# Altium PCB REV_A_PCB.PcbDoc
Units mm, origin at the board's own origin, x right, y up, seen from the top; angles counter-clockwise.
Board outline 99 x 68.12 mm, 4 copper layers (Top Layer, GND, PWR, Bottom Layer), stack 1.564 mm thick; 78 components, 63 nets, 257 pads, 153 vias.
Unrouted connection lines stored in the file: 4.
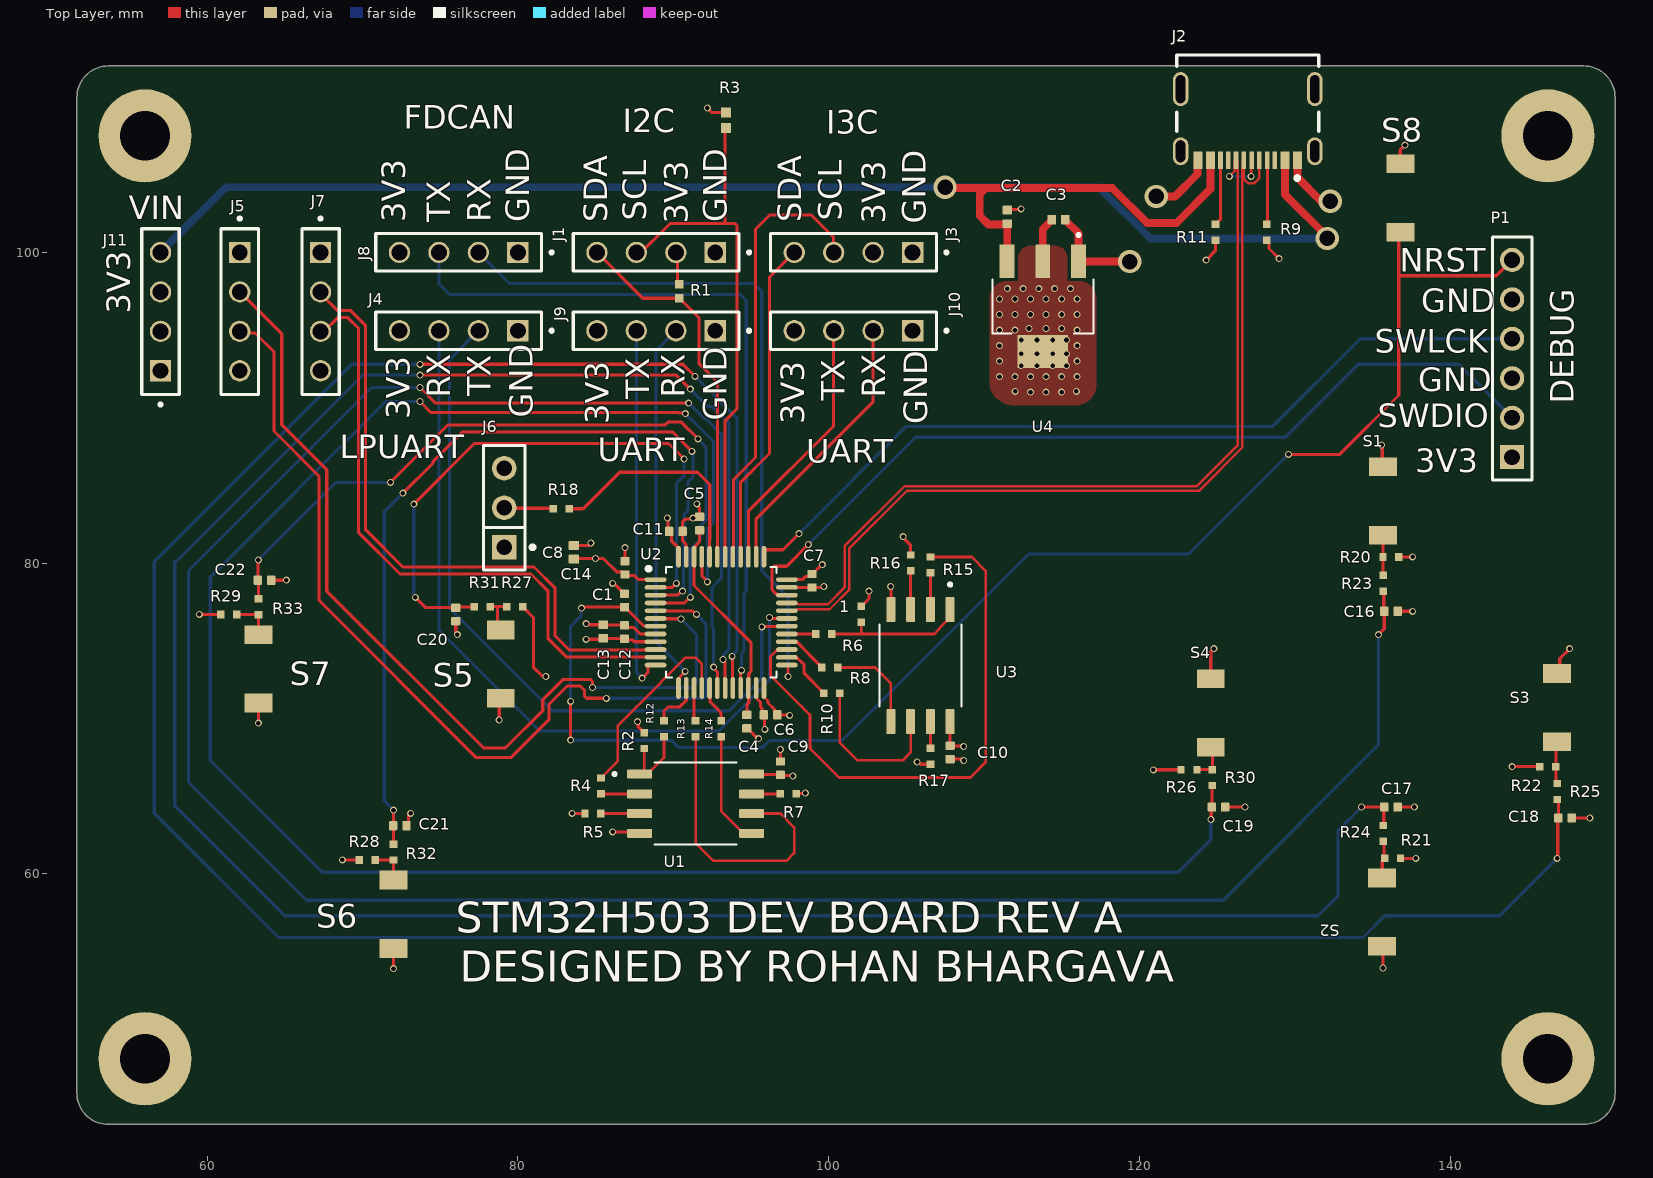
[diagram p0: Top Layer view]
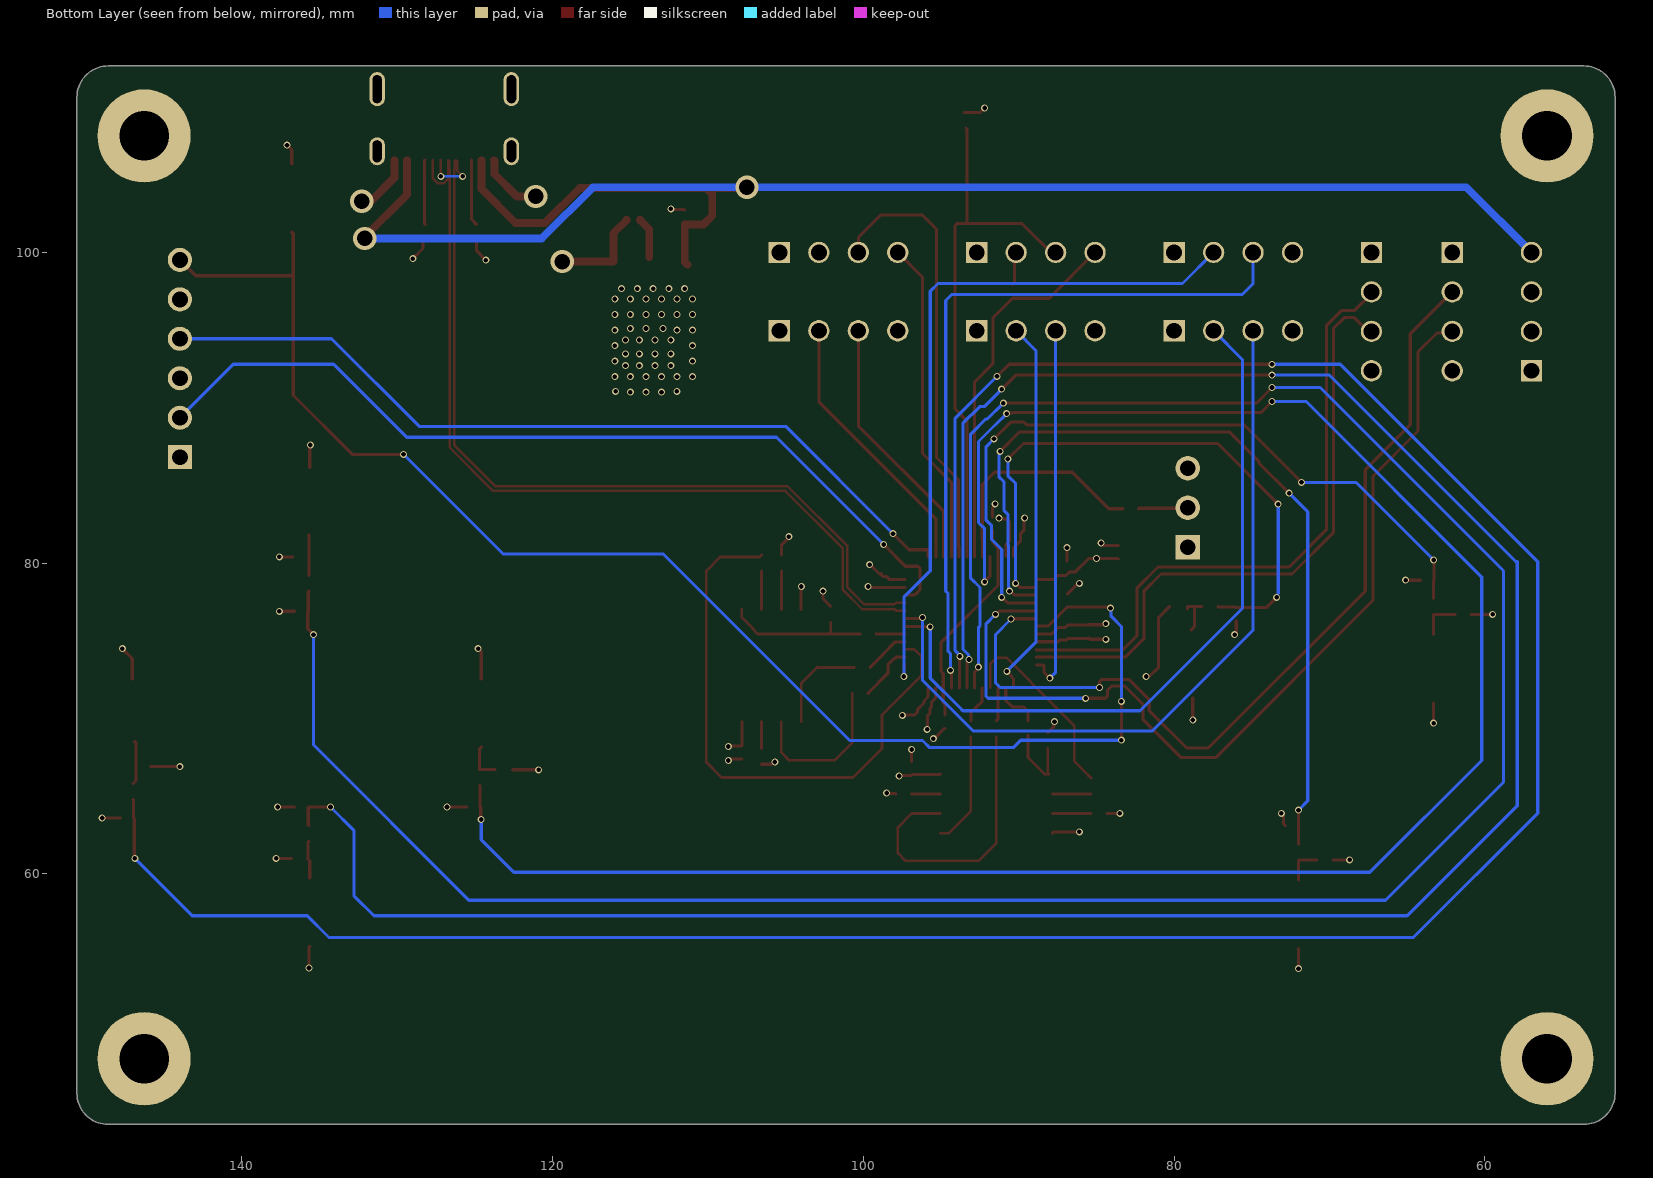
[diagram p1: Bottom Layer view, seen from below]
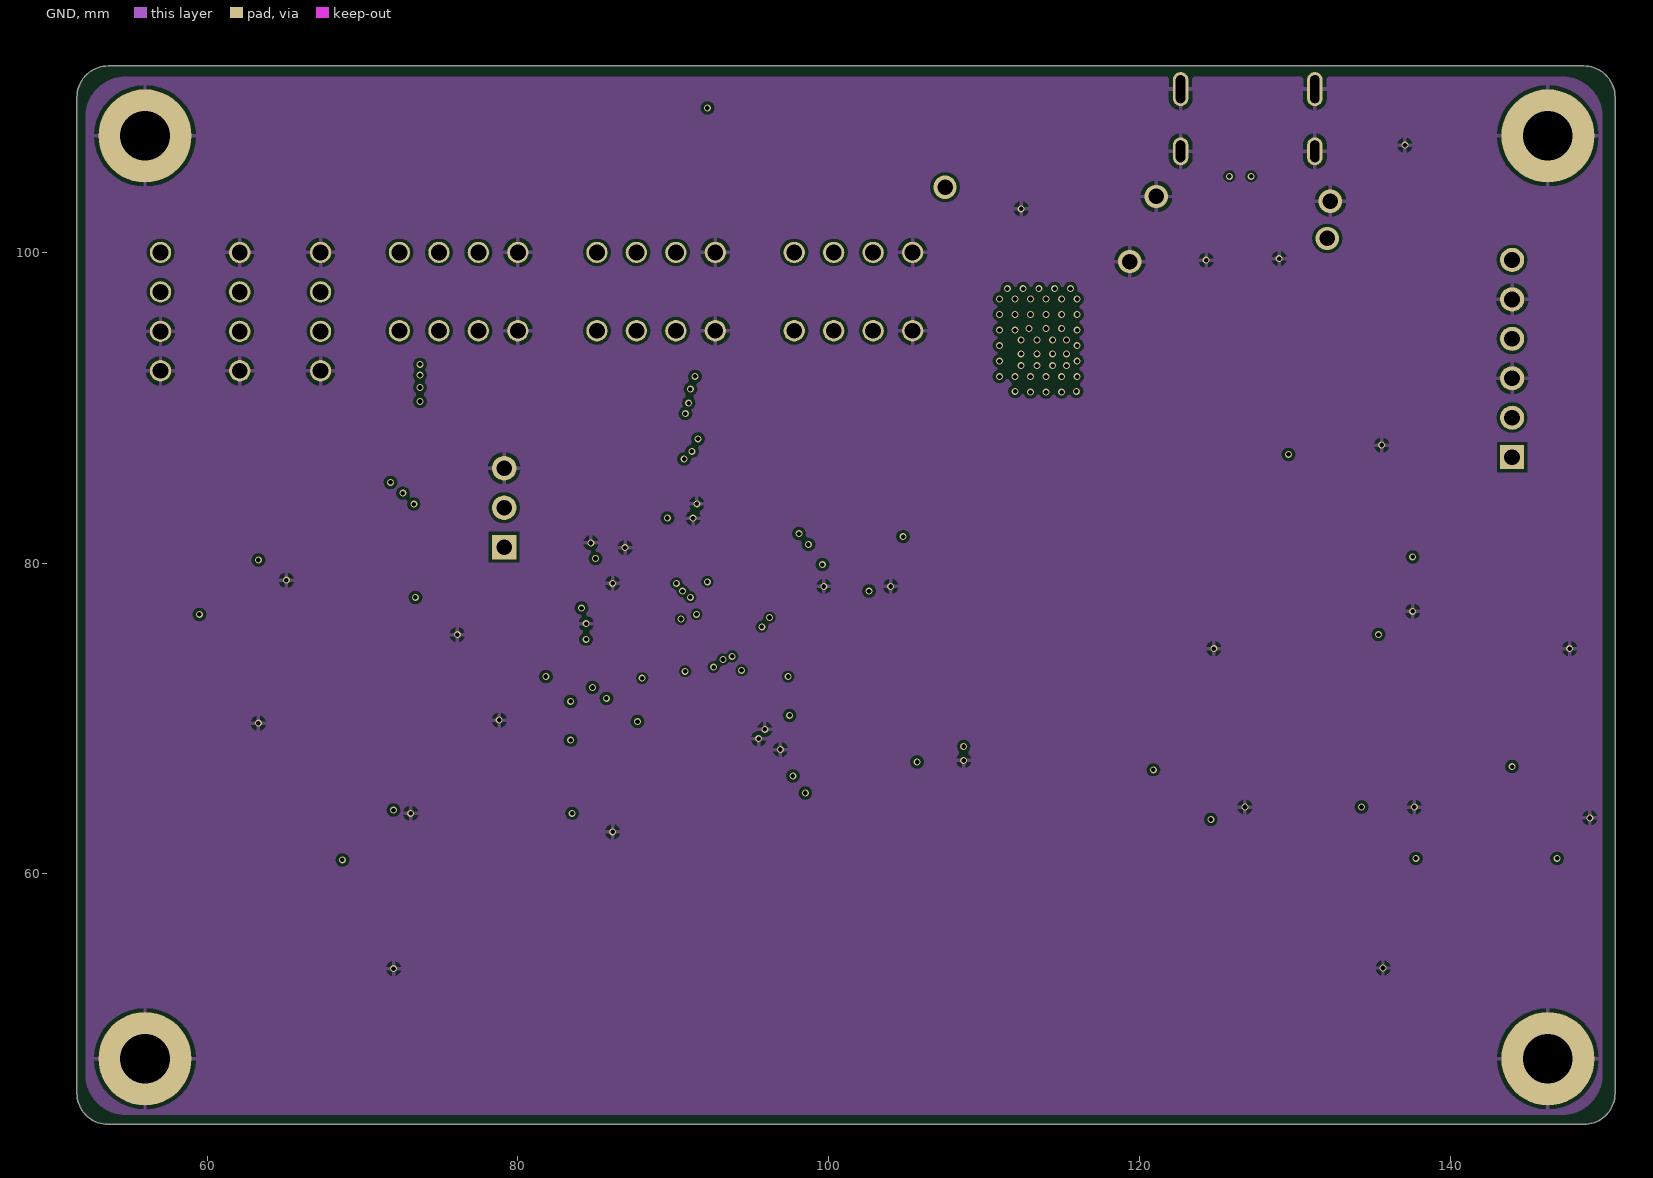
[diagram p2: GND]
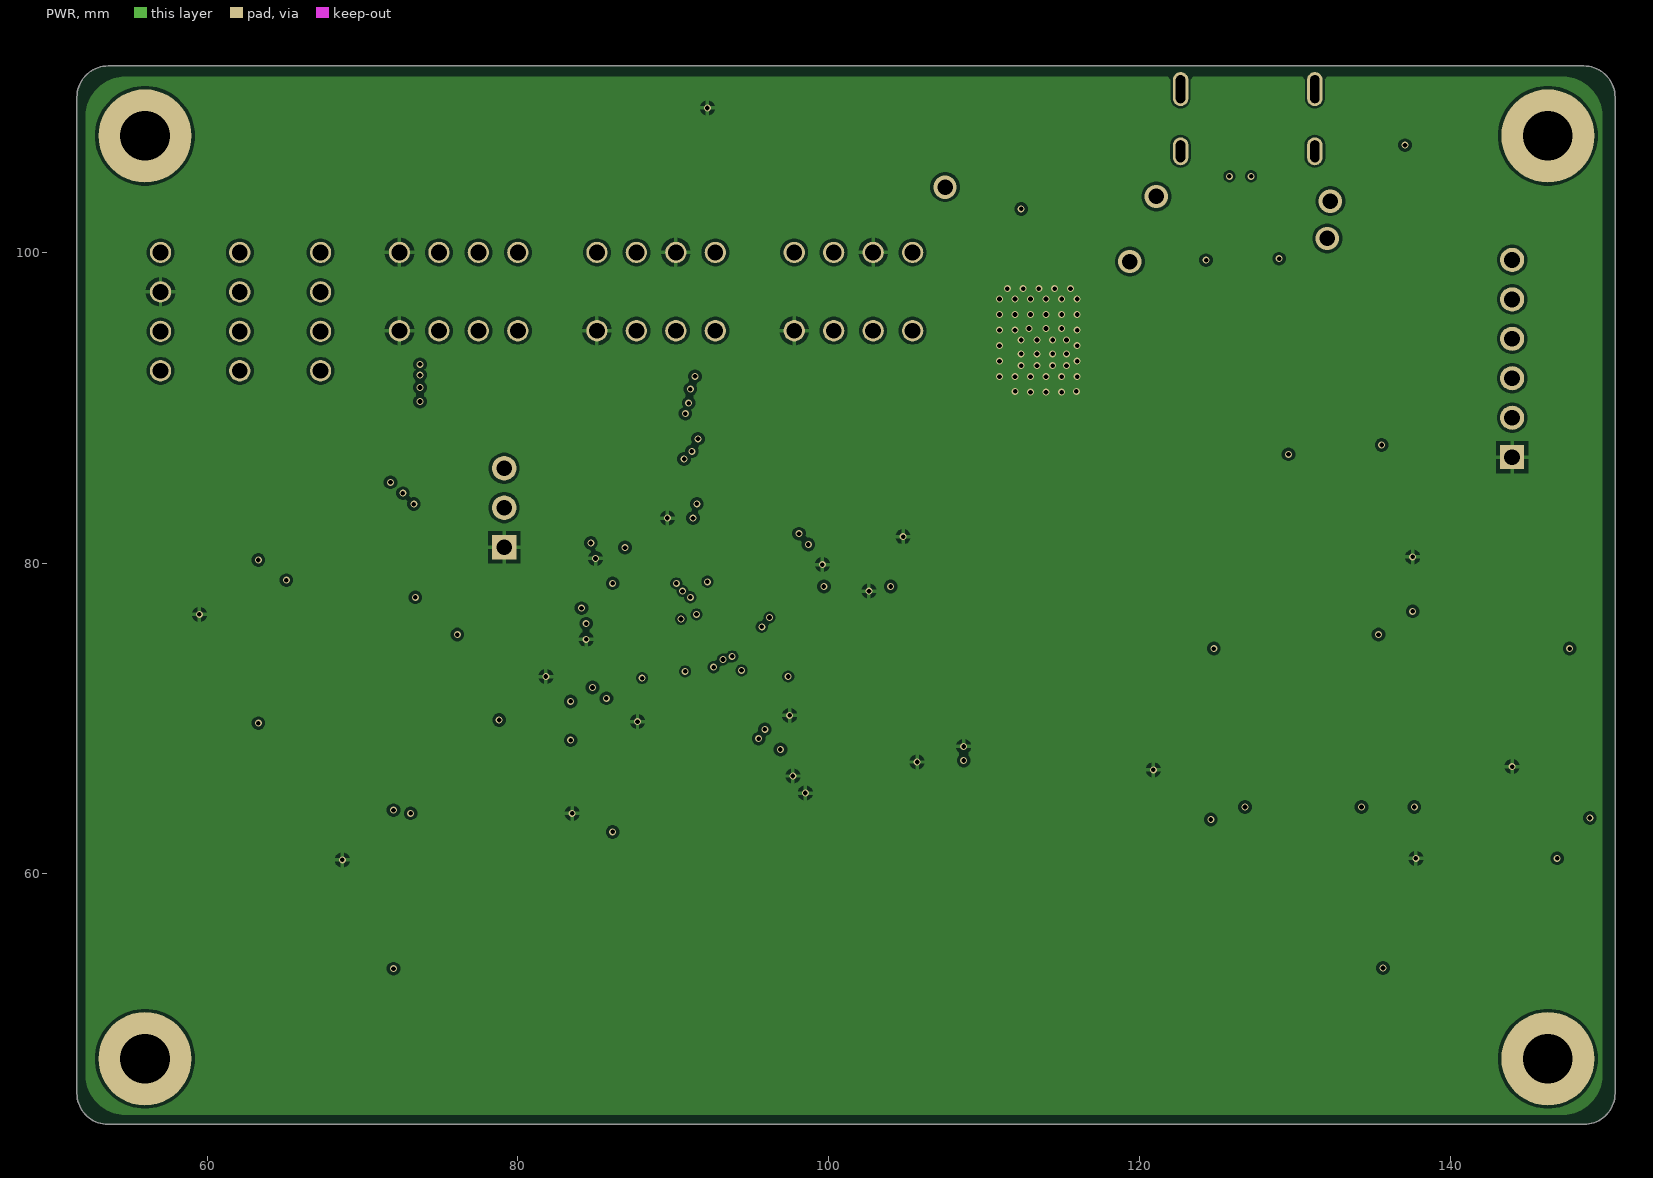
[diagram p3: PWR]
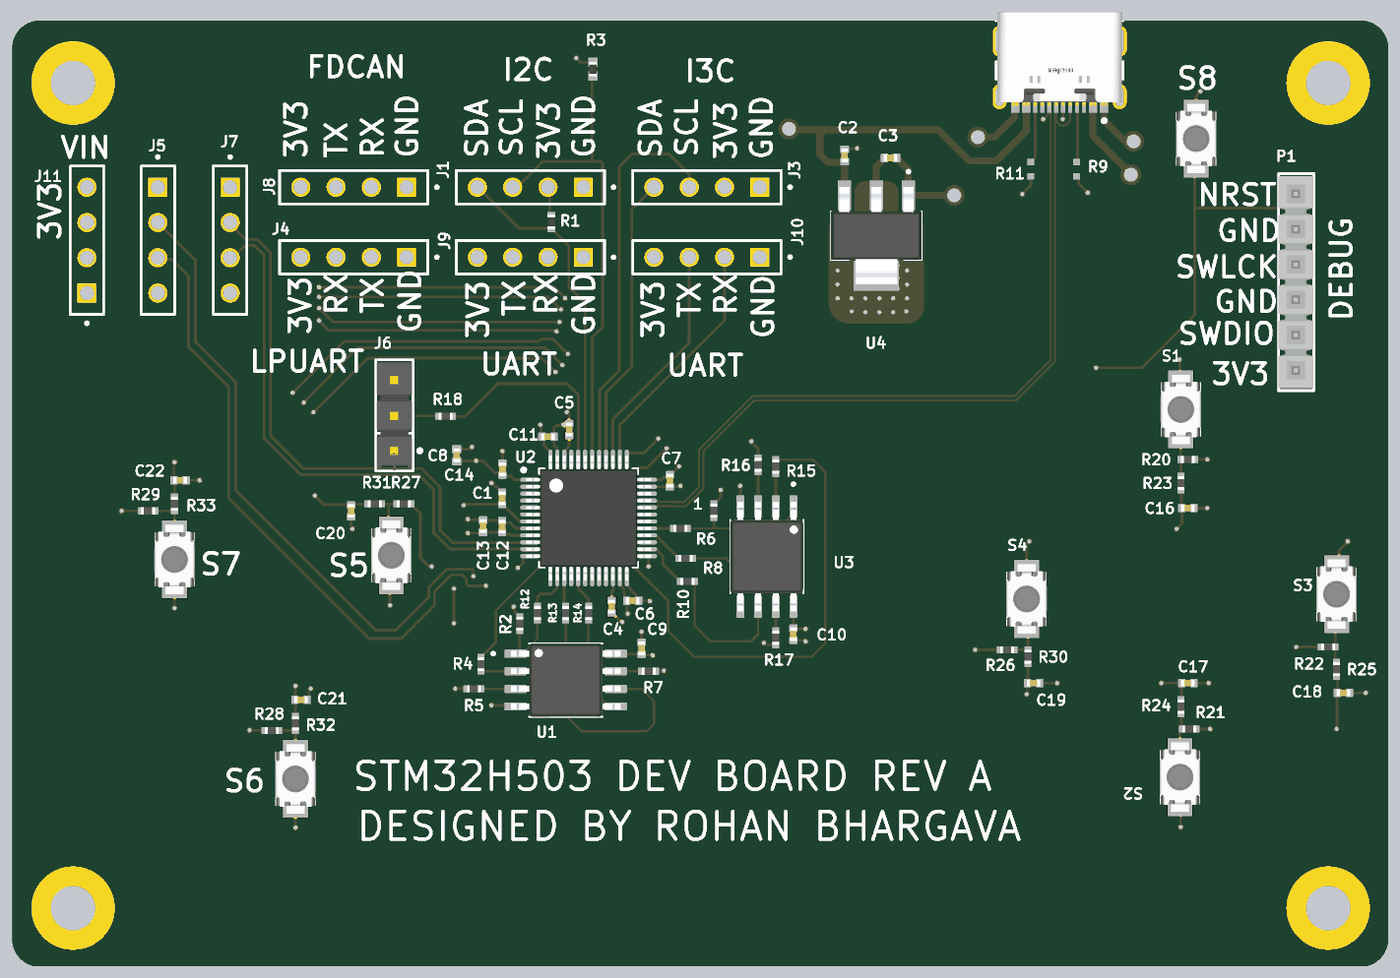
[diagram p4: 3D render of the assembled board from above, using the file's embedded part models]

## Layer stack, top to bottom
Top Solder: solder mask 0.0102, Solder Resist, Dk 3.5
Top Layer: signal copper 0.035
Dielectric 2: prepreg 0.0994, PP-006, Dk 4.1
GND: signal copper 0.0152
Dielectric 1: dielectric 1.265, FR-4, Dk 4.6
PWR: signal copper 0.0152
Dielectric 3: prepreg 0.0994, PP-006, Dk 4.1
Bottom Layer: signal copper 0.035
Bottom Solder: solder mask 0.0102, Solder Resist, Dk 3.5

## Board outline
51.622,45.875 51.622,110 cw(c53.622,110) 53.622,112 148.622,112 cw(c148.622,110) 150.622,110 150.622,45.875 cw(c148.622,45.875) 148.622,43.875 53.622,43.875 cw(c53.622,45.875)

## Design rules (kind name [scope] priority, off if disabled: settings)
Clearance ADC_PAIR_CLEARANCE [InNet('ADC1_IN1_N') vs InNet('ADC1_IN1_P')] p1: gap=0.1 ignorepadtopadclearanceinfootprint=FALSE
Clearance USB_DIFF_PAIR_CLEARANCE [InNetClass('USB_FS') vs InNetClass('USB_FS')] p2: gap=0.15 ignorepadtopadclearanceinfootprint=FALSE
Clearance USB_PORT [WithinRoom('USB')] p3: gap=0.15 ignorepadtopadclearanceinfootprint=FALSE
Clearance MCU_BREAKOUT [WithinRoom('MCU')] p4: gap=0.15 ignorepadtopadclearanceinfootprint=FALSE
Clearance [All] p5: gap=0.2 ignorepadtopadclearanceinfootprint=FALSE
DiffPairsRouting ADC_Diff_Pair [InDifferentialPair('ADC1_IN1')] p1: maxlimit=0.25 minlimit=0.25 mostfreqgap=0.25 toplayer_minwidth=0.2 toplayer_maxwidth=0.2 toplayer_prefwidth=0.2 midlayer1_minwidth=0.2 midlayer1_maxwidth=0.2 midlayer1_prefwidth=0.2 midlayer2_minwidth=0.2 midlayer2_maxwidth=0.2 midlayer2_prefwidth=0.2 bottomlayer_minwidth=0.2 bottomlayer_maxwidth=0.2 bottomlayer_prefwidth=0.2 maxuncoupledlength=12.7
DiffPairsRouting USB_FS [InDifferentialPair('USB_D')] p2: maxlimit=0.15 minlimit=0.15 mostfreqgap=0.15 toplayer_minwidth=0.159 toplayer_maxwidth=0.159 toplayer_prefwidth=0.159 midlayer1_minwidth=0.159 midlayer1_maxwidth=0.159 midlayer1_prefwidth=0.159 midlayer2_minwidth=0.159 midlayer2_maxwidth=0.159 midlayer2_prefwidth=0.159 bottomlayer_minwidth=0.159 bottomlayer_maxwidth=0.159 bottomlayer_prefwidth=0.159 maxuncoupledlength=12.7
DiffPairsRouting [All] p3: maxlimit=0.254 minlimit=0.254 mostfreqgap=0.254 toplayer_minwidth=0.381 toplayer_maxwidth=0.381 toplayer_prefwidth=0.381 midlayer1_minwidth=0.381 midlayer1_maxwidth=0.381 midlayer1_prefwidth=0.381 midlayer2_minwidth=0.381 midlayer2_maxwidth=0.381 midlayer2_prefwidth=0.381 bottomlayer_minwidth=0.381 bottomlayer_maxwidth=0.381 bottomlayer_prefwidth=0.381 maxuncoupledlength=12.7
HoleSize [All] p1: absolutevalues=TRUE maxlimit=5 minlimit=0.025 maxpercent=80.000 minpercent=20.000
MinimumSolderMaskSliver MCU_Solder_Mask [WithinRoom('MCU')] p1: minsoldermaskwidth=0.15
MinimumSolderMaskSliver [All] p2: minsoldermaskwidth=0.1
PlaneConnect LDO_Heatsink_Connection [WithinRoom('LDO_Heatsink')] p1: planeconnectstyle=Direct reliefexpansion=0.508 reliefentries=4 reliefconductorwidth=0.254 reliefairgap=0.254
PlaneConnect [All] p2: planeconnectstyle=Relief reliefexpansion=0.508 reliefentries=4 reliefconductorwidth=0.254 reliefairgap=0.254
PolygonConnect LDO_Heatsink_Poly [WithinRoom('LDO_Heatsink')] p1: connectstyle=Direct reliefconductorwidth=0.254 reliefentries=4 polygonreliefangle="90 Angle" airgapwidth=0.254
PolygonConnect [All] p2: connectstyle=Relief reliefconductorwidth=0.254 reliefentries=4 polygonreliefangle="90 Angle" airgapwidth=0.254
RoomDefinition LDO_Heatsink [False vs False] p1: confinementstyle=ConfineIn formatcopy=TRUE lockcomponents=FALSE outline 110.236,100.965 117.348,100.965 117.348,90.17 110.236,90.17
RoomDefinition USB [InComponentClass('Room Definition2') vs False] p2: confinementstyle=ConfineIn formatcopy=TRUE lockcomponents=FALSE outline 121.597,104.28 121.597,113.163 132.361,113.163 132.361,104.28
RoomDefinition MCU [InComponentClass('Room Definition1') vs False] p3: confinementstyle=ConfineIn formatcopy=TRUE lockcomponents=FALSE outline 87.637,70.746 87.637,81.654 98.545,81.654 98.545,70.746
RoutingVias [All] p1: holewidth=0.3 width=0.45 viastyle="Through Hole" minholewidth=0.3 minwidth=0.45 maxholewidth=5 maxwidth=10
SilkToSilkClearance [All] p1: silktosilkclearance=0.15
SilkToSolderMaskClearance [IsPad] p1: minsilkscreentomaskgap=0.15 clearancetoexposedcopper=TRUE
SolderMaskExpansion [All] p1: expansion=0 istentingtop=FALSE
SupplyNets "Schematic Supply Nets_3" [InNet('3V3')] p1: voltage=0.000
SupplyNets "Schematic Supply Nets_2" [InNet('GND')] p2: voltage=0.000
SupplyNets "Schematic Supply Nets_1" [InNet('VIN')] p3: voltage=0.000
SupplyNets "Schematic Supply Nets" [InNet('VCAP')] p4: voltage=0.000
Width USB_FS_WIDTH [InNetClass('USB_FS')] p1: maxlimit=0.159 minlimit=0.159 preferedwidth=0.159
Width SPI [InNetClass('SPI')] p2: maxlimit=0.171 minlimit=0.171 preferedwidth=0.171
Width [All] p3: maxlimit=1 minlimit=0.18 preferedwidth=0.2
24 further rules are at their usual default settings.

## Classes and differential pairs
component class "Room Definition2": J2
net class USB_FS: USB_D_N USB_D_P
net class SPI: SPI1_MISO SPI1_MOSI SPI1_NCS SPI1_SCK SPI2_CLK SPI2_MISO SPI2_MOSI SPI2_NCS
component class "Room Definition1": U2
component class Sheet2: C2 C3 C4 C5 C6 C7 C8 C9 C10 C11 C12 C13 C14 J11 U4
component class Sheet1: 1 C1 C16 C17 C18 C19 C20 C21 C22 J1 J2 J3 J4 J5 J6 J7 J8 J9 J10 P1 R1 R2 R3 R4 R5 R6 R7 R8 R9 R10 R11 R12 R13 R14 R15 R16 R17 R18 R20 R21 R22 R23 R24 R25 R26 R27 R28 R29 R30 R31 R32 R33 S1 S2 S3 S4 S5 S6 S7 S8 U1 U2 U3
differential pair USB_D: +USB_D_P -USB_D_N
differential pair ADC1_IN1: +ADC1_IN1_P -ADC1_IN1_N

## Components (designator, comment, footprint, x,y, rotation, side; value= is the part's Value field where it differs from the comment)
1 "ERJ2RKF1002X" RES_ERJ2RKF1002X 102.108,76.708 r90 top
C1 "CL05B104KO5NNNC" CAPC1005X55N 86.868,77.597 r90 top
C2 "CL05A105KA5NQNC" CAPC1005X60N 111.506,102.289 r270 top
C3 "CL05A105KA5NQNC" CAPC1005X60N 114.808,102.108 r180 top
C4 "CL05A225MQ5NSNC" CAPC1005X57N 94.742,69.798 r90 top
C5 "CL05A225MQ5NSNC" CAPC1005X57N 91.694,82.55 r270 top
C6 "CL05B104KO5NNNC" CAPC1005X55N 96.266,70.231 r0 top
C7 "CL05B104KO5NNNC" CAPC1005X55N 98.933,78.867 r90 top
C8 "CL05A475MP5NRNC" CAPC1005X65N 83.6,80.7 r270 top
C9 "CL05B104KO5NNNC" CAPC1005X55N 96.901,66.802 r270 top
C10 "CL05B104KO5NNNC" CAPC1005X55N 107.823,67.818 r90 top
C11 "CL05B104KO5NNNC" CAPC1005X55N 90.17,82.042 r180 top
C12 "CL05B104KO5NNNC" CAPC1005X55N 86.868,75.565 r270 top
C13 "CL05A105KA5NQNC" CAPC1005X60N 85.5,75.6 r270 top
C14 "CL05B104KO5NNNC" CAPC1005X55N 86.9,79.7 r270 top
C16 "CL05B104KO5NNNC" CAPC1005X55N 136.2,76.9 r180 top
C17 "CL05B104KO5NNNC" CAPC1005X55N 136.2,64.3 r180 top
C18 "CL05B104KO5NNNC" CAPC1005X55N 147.4,63.6 r180 top
C19 "CL05B104KO5NNNC" CAPC1005X55N 125.1,64.3 r180 top
C20 "CL05B104KO5NNNC" CAPC1005X55N 76,76.7 r90 top
C21 "CL05B104KO5NNNC" CAPC1005X55N 72.4,63.1 r180 top
C22 "CL05B104KO5NNNC" CAPC1005X55N 63.7,78.9 r180 top
J1 "SSQ-104-01-T-S" SAMTEC_SSQ-104-01-T-S 88.9,100 r180 top
J2 "217179-0001" FP-2171790001-MFG 126.979,109.359 r180 top
J3 "SSQ-104-01-T-S" SAMTEC_SSQ-104-01-T-S 101.6,100 r180 top
J4 "SSQ-104-01-T-S" SAMTEC_SSQ-104-01-T-S 76.19,94.96 r180 top
J5 "SSQ-104-01-T-S" SAMTEC_SSQ-104-01-T-S 62.1,96.19 r270 top
J6 "TSW-103-14-G-S" FP-TSW-103-14-G-S-MFG 79.121,83.566 r90 top
J7 "SSQ-104-01-T-S" SAMTEC_SSQ-104-01-T-S 67.3,96.19 r270 top
J8 "SSQ-104-01-T-S" SAMTEC_SSQ-104-01-T-S 76.19,100 r180 top
J9 "SSQ-104-01-T-S" SAMTEC_SSQ-104-01-T-S 88.9,94.96 r180 top
J10 "SSQ-104-01-T-S" SAMTEC_SSQ-104-01-T-S 101.6,94.96 r180 top
J11 "SSQ-104-01-T-S" SAMTEC_SSQ-104-01-T-S 57,96.19 r90 top
P1 "TSW-106-07-G-S" SMTC-TSW-106-07-X-S 144,86.82 r90 top
R1 "ERJ-2RKF2201X" RESC1005X40X25NL05T05 90.4,97.5 r90 top
R2 "ERJ2RKF1002X" RES_ERJ2RKF1002X 88.138,68.58 r270 top
R3 "ERJ-2RKF2201X" RESC1005X40X25ML05T05 93.4,108.5 r90 top
R4 "ERJ2RKF33R0X" RES_ERJ2RKF33R0X 85.344,65.659 r90 top
R5 "ERJ2RKF1002X" RES_ERJ2RKF1002X 84.836,63.881 r180 top
R6 "ERJ2RKF33R0X" RES_ERJ2RKF33R0X 99.695,75.438 r180 top
R7 "ERJ2RKF1002X" RES_ERJ2RKF1002X 97.409,65.151 r0 top
R8 "ERJ2RKF33R0X" RES_ERJ2RKF33R0X 100.076,73.279 r180 top
R9 "ERJ2RKF5101X" RES_ERJ2RKF5101X 128.2,101.3 r270 top
R10 "ERJ2RKF33R0X" RES_ERJ2RKF33R0X 100.203,71.628 r180 top
R11 "ERJ2RKF5101X" RES_ERJ2RKF5101X 124.9,101.3 r270 top
R12 "ERJ2RKF33R0X" RES_ERJ2RKF33R0X 89.408,69.342 r90 top
R13 "ERJ2RKF33R0X" RES_ERJ2RKF33R0X 91.44,69.342 r90 top
R14 "ERJ2RKF33R0X" RES_ERJ2RKF33R0X 93.091,69.342 r90 top
R15 "ERJ2RKF33R0X" RES_ERJ2RKF33R0X 106.553,79.883 r90 top
R16 "ERJ2RKF1002X" RES_ERJ2RKF1002X 105.283,80.01 r90 top
R17 "ERJ2RKF1002X" RES_ERJ2RKF1002X 106.553,67.564 r270 top
R18 "ERJ2RKF1002X" RES_ERJ2RKF1002X 82.8,83.5 r0 top
R20 "ERJ2RKF1002X" RES_ERJ2RKF1002X 136.2,80.4 r180 top
R21 "ERJ2RKF1002X" RES_ERJ2RKF1002X 136.3,61 r180 top
R22 "ERJ2RKF1002X" RES_ERJ2RKF1002X 146.3,66.9 r0 top
R23 "ERJ2RKF1002X" RES_ERJ2RKF1002X 135.7,78.7 r270 top
R24 "ERJ2RKF1002X" RES_ERJ2RKF1002X 135.7,62.6 r90 top
R25 "ERJ2RKF1002X" RES_ERJ2RKF1002X 146.9,65.3 r270 top
R26 "ERJ2RKF1002X" RES_ERJ2RKF1002X 123.2,66.7 r0 top
R27 "ERJ2RKF1002X" RES_ERJ2RKF1002X 79.8,77.2 r180 top
R28 "ERJ2RKF1002X" RES_ERJ2RKF1002X 70.3,60.9 r0 top
R29 "ERJ2RKF1002X" RES_ERJ2RKF1002X 61.4,76.7 r0 top
R30 "ERJ2RKF1002X" RES_ERJ2RKF1002X 124.7,66.2 r270 top
R31 "ERJ2RKF1002X" RES_ERJ2RKF1002X 77.7,77.2 r180 top
R32 "ERJ2RKF1002X" RES_ERJ2RKF1002X 72,61.4 r90 top
R33 "ERJ2RKF1002X" RES_ERJ2RKF1002X 63.3,77.2 r90 top
S1 "TS-1088-AR02016" "4x3 SWT" 135.7,84 r90 top
S2 "TS-1088-AR02016" "4x3 SWT" 135.636,57.531 r270 top
S3 "TS-1088-AR02016" "4x3 SWT" 146.9,70.7 r90 top
S4 "TS-1088-AR02016" "4x3 SWT" 124.6,70.358 r90 top
S5 "TS-1088-AR02016" "4x3 SWT" 78.9,73.5 r270 top
S6 "TS-1088-AR02016" "4x3 SWT" 72,57.4 r270 top
S7 "TS-1088-AR02016" "4x3 SWT" 63.3,73.2 r270 top
S8 "TS-1088-AR02016" "4x3 SWT" 136.8,103.5 r90 top
U1 "W25Q128JVSIQ" SOIC127P790X216-8N 91.44,64.516 r0 top
U2 "STM32H503CBT6" TSQFP50P900X900X160-48N 93.091,76.189 r0 top
U3 "W25Q128JVSIQ" SOIC127P790X216-8N 105.918,73.406 r270 top
U4 "TLV1117LV33DCYR" VREG_TLV1117LV33DCYR 113.792,96.52 r270 top

## Footprints (in the part's own frame and the unit in brackets; to place one, negate y for a bottom-side part, rotate by r counter-clockwise, add the part's x,y. Pads: shape width x height; smd on the part's side, far side on the other; paste and mask are expansions set on the pad)
"4x3 SWT" [mm]
  rect 1.2x1.8 smd mask+0.05: 1(-2.2,0) 2(2.2,0)
  body extent -2.5,-1.47 2.5,1.46, height 2.01
CAPC1005X55N [mm]
  rrect25% 0.54x0.6 smd: 1(-0.432,0) 2(0.432,0)
  body extent -0.5,-0.25 0.5,0.25, height 0.55
CAPC1005X57N [mm]
  rrect25% 0.54x0.61 smd paste+0 mask+0.102: 1(-0.433,0) 2(0.433,0)
  body extent -0.5,-0.25 0.5,0.25, height 0.57
CAPC1005X60N [mm]
  rrect25% 0.56x0.63 smd: 1(-0.435,0) 2(0.435,0)
  body extent -0.5,-0.25 0.5,0.25, height 0.6
CAPC1005X65N [mm]
  rrect25% 0.6x0.67 smd: 1(-0.437,0) 2(0.437,0)
  body extent -0.5,-0.25 0.5,0.25, height 0.65
FP-2171790001-MFG [mm]
  rrect100% 1x1.8 hole 1.4 slot 0.6 at 0 deg paste-2539.97 mask+0: 1(-4.32,2.85) 2(4.32,2.85)
  rrect100% 1x2.2 hole 1.8 slot 0.6 at 0 deg paste-2539.97 mask+0: 3(-4.32,-1.15) 4(4.32,-1.15)
  rect 0.6x1.15 smd paste+0 mask+0: A1-B12(-3.2,3.425) A4-B9(-2.4,3.425) B1-A12(3.2,3.425) B4-A9(2.4,3.425)
  rect 0.3x1.15 smd paste+0 mask+0: A5(-1.25,3.425) A6(-0.25,3.425) A7(0.25,3.425) A8(1.25,3.425) B5(1.75,3.425) B6(0.75,3.425) B7(-0.75,3.425) B8(-1.75,3.425)
  silkscreen extent -4.57,-3.35 4.57,4.7, body extent -4.92,-3.45 4.92,4.1, height 0.25
FP-TSW-103-14-G-S-MFG [mm]
  rect 1.57x1.57 hole 1.02 paste-2539.97 mask+0: 1(-2.54,0)
  round 1.57 hole 1.02 paste-2539.97 mask+0: 2(0,0) 3(2.54,0)
  silkscreen extent -4,-1.95 4,1.34, body extent -4.1,-1.44 4.1,1.44, height 0.25
RES_ERJ2RKF33R0X [mm]
  rect 0.475x0.5 smd: 1(-0.512,0) 2(0.512,0)
  body extent -0.5,-0.25 0.5,0.25, height 0.35
RES_ERJ2RKF1002X [mm]
  rect 0.475x0.5 smd: 1(-0.512,0) 2(0.512,0)
  body extent -0.5,-0.25 0.5,0.25, height 0.35
RES_ERJ2RKF5101X [mm]
  rect 0.475x0.5 smd: 1(-0.512,0) 2(0.512,0)
RESC1005X40X25ML05T05 [mm] "Chip Resistor, 2-Leads, Body 1.05x0.55mm, IPC Low Density"
  rect 0.65x0.65 smd: 1(-0.5,0) 2(0.5,0)
  body extent -0.53,-0.28 0.53,0.28, height 0.4
RESC1005X40X25NL05T05 [mm] "Chip Resistor, 2-Leads, Body 1.05x0.55mm, IPC Medium Density"
  rect 0.55x0.55 smd: 1(-0.45,0) 2(0.45,0)
  body extent -0.53,-0.28 0.53,0.28, height 0.4
SAMTEC_SSQ-104-01-T-S [mm]
  rect 1.37x1.37 / inner round 1.37 / far side rect 1.37x1.37 hole 1.02: 01(-3.81,0)
  round 1.37 hole 1.02: 02(-1.27,0) 03(1.27,0) 04(3.81,0)
  silkscreen extent -6.08,-1.2 5.34,1.2
SMTC-TSW-106-07-X-S [mm] ".025 SQ Post Terminal Strip Assembly, 1x6 Pins, Vertical, 2.54mm Pitch, Male"
  rect 1.55x1.55 hole 1.02: 1(0,0)
  round 1.55 hole 1.02: 2(2.54,0) 3(5.08,0) 4(7.62,0) 5(10.16,0) 6(12.7,0)
  silkscreen extent -1.46,-1.27 14.16,1.27, body extent -1.27,-1.24 13.97,1.3, height 8.38
SOIC127P790X216-8N [mm]
  rrect25% 1.61x0.58 smd: 1(-3.605,1.905) 2(-3.605,0.635) 3(-3.605,-0.635) 4(-3.605,-1.905) 5(3.605,-1.905) 6(3.605,-0.635) 7(3.605,0.635) 8(3.605,1.905)
  silkscreen extent -5.31,-2.64 2.64,2.64, body extent -3.95,-2.64 3.95,2.64, height 2.16
TSQFP50P900X900X160-48N [mm] "TSQFP, 48-Leads, Body 7.00x7.00mm, Pitch 0.50mm, IPC Medium Density"
  oval 1.4x0.3 smd: 1(-4.225,2.75) 2(-4.225,2.25) 3(-4.225,1.75) 4(-4.225,1.25) 5(-4.225,0.75) 6(-4.225,0.25) 7(-4.225,-0.25) 8(-4.225,-0.75) 9(-4.225,-1.25) 10(-4.225,-1.75) 11(-4.225,-2.25) 12(-4.225,-2.75) 25(4.225,-2.75) 26(4.225,-2.25) 27(4.225,-1.75) 28(4.225,-1.25) 29(4.225,-0.75) 30(4.225,-0.25) 31(4.225,0.25) 32(4.225,0.75) 33(4.225,1.25) 34(4.225,1.75) 35(4.225,2.25) 36(4.225,2.75)
  oval 0.3x1.4 smd: 13(-2.75,-4.225) 14(-2.25,-4.225) 15(-1.75,-4.225) 16(-1.25,-4.225) 17(-0.75,-4.225) 18(-0.25,-4.225) 19(0.25,-4.225) 20(0.75,-4.225) 21(1.25,-4.225) 22(1.75,-4.225) 23(2.25,-4.225) 24(2.75,-4.225) 37(2.75,4.225) 38(2.25,4.225) 39(1.75,4.225) 40(1.25,4.225) 41(0.75,4.225) 42(0.25,4.225) 43(-0.25,4.225) 44(-0.75,4.225) 45(-1.25,4.225) 46(-1.75,4.225) 47(-2.25,4.225) 48(-2.75,4.225)
  silkscreen extent -4.8,-3.56 3.56,3.57, body extent -4.5,-4.5 4.5,4.5, height 1.6
VREG_TLV1117LV33DCYR [mm]
  rect 2.15x0.95 smd: 1(-2.9,2.3) 2(-2.9,0) 3(-2.9,-2.3)
  rect 2.15x3.25 smd: 4(2.9,0)
  silkscreen extent -4.7,-3.25 1.75,3.25, body extent -3.5,-3.25 3.5,3.25, height 1.8

## Part data
1 R2 R5 R7 R16 R17 R20 R21 R22 R23 R24 R25 R26 R27 R28 R29 R30 R31 R32 R33: library part CMP-2000-07588-1, "Chip Resistor, 10 KOhm, +/- 1%, 0.1 W, -55 to 155 degC, 0402 (1005 Metric), RoHS, Tape and Reel", Case Code (Imperial)=0402, Case Code (Metric)=1005, Manufacturer=Panasonic, Max Operating Temperature=155degC, Max Power Dissipation=100mW, Min Operating Temperature=-55degC, Package Description="2-Pin Surface Mount Device, Body 1 x 0.5 mm", Package Quantity=1, Package Reference=402, Resistance=10KOhm, Temperature Coefficient=100ppm\/degreesC, Tolerance=1%, Voltage Rating=50V, Case\/Package=0402, Composition=ThickFilm, Contact Plating=Tin, Datasheet URL=https://industrial.panasonic.com/cdbs/www-data/pdf/RDA0000/AOA0000C304.pdf, Datasheet Version=02/2017, Depth=0.5mm, Height=0.35mm, Lead Free=LeadFree, Length=1mm, Manufacturer URL=http://www.panasonic.com/, Military Standard=Not, Mount=SurfaceMount, Mounting Technology=SurfaceMount, Number of Pins=2, Number of Terminations=2, Packaging=TapeandReel, Power Rating=100mW, Radiation Hardening=No, REACH SVHC=NoSVHC, RoHSCompliant=True, Termination=SMD/SMT, Voltage Rating (DC)=50V, Width=0.02inch
C1 C6 C7 C9 C10 C11 C12 C14 C16 C17 C18 C19 C20 C21 C22: "0.1 ÂµF Â±10% 16V Ceramic Capacitor X7R 0402 (1005 Metric)", Package="SMD-2 Samsung", Check_prices=https://www.snapeda.com/parts/CL05B104KO5NNNC/Samsung/view-part/?ref=eda, MF=Samsung, MP=CL05B104KO5NNNC, SnapEDA_Link=https://www.snapeda.com/parts/CL05B104KO5NNNC/Samsung/view-part/?ref=snap
C2 C3 C13: "1 ÂµF Â±10% 25V Ceramic Capacitor X5R 0402 (1005 Metric)", Package="SMD-2 Samsung", Check_prices=https://www.snapeda.com/parts/CL05A105KA5NQNC/Samsung/view-part/?ref=eda, MF=Samsung, MP=CL05A105KA5NQNC, SnapEDA_Link=https://www.snapeda.com/parts/CL05A105KA5NQNC/Samsung/view-part/?ref=snap
C4 C5: "2.2 ÂµF Â±20% 6.3V Ceramic Capacitor X5R 0402 (1005 Metric)", Package="SMD-2 Samsung", Check_prices=https://www.snapeda.com/parts/CL05A225MQ5NSNC/Samsung/view-part/?ref=eda, MF=Samsung, MP=CL05A225MQ5NSNC, SnapEDA_Link=https://www.snapeda.com/parts/CL05A225MQ5NSNC/Samsung/view-part/?ref=snap
C8: "4.7 ÂµF Â±20% 10V Ceramic Capacitor X5R 0402 (1005 Metric)", Package="SMD-2 Samsung", Check_prices=https://www.snapeda.com/parts/CL05A475MP5NRNC/Samsung/view-part/?ref=eda, MF=Samsung, MP=CL05A475MP5NRNC, SnapEDA_Link=https://www.snapeda.com/parts/CL05A475MP5NRNC/Samsung/view-part/?ref=snap
J1 J3 J4 J5 J7 J8 J9 J10 J11 R9 R11: Package=None, Availability=Unavailable, Price=None
  J1 J3 J4 J5 J7 J8 J9 J10 J11: MF="Samtec Inc.", MP=SSQ-104-01-T-S
  R9 R11: MP=ERJ2RKF5101X
J2: library part CMP-04767-000028-2, "CONN RCP USB2.0 TYP C 24P SMD RA", Current Rating=1.25A, Max Operating Temperature=85°C, Min Operating Temperature=-40°C, Voltage Rating=30V, Contact Material="Gold, Nickel", Gender=Receptacle, Height=3.36mm, NexarPartId=117190526, Number of Contacts=16, USB Standard="USB 2.0"
J6: library part CMP-02766-001743-1, "CONN HEADER VERT 3POS 2.54MM", Color=Black, Flammability Rating="UL94 V-0", Max Current Rating=7.6A, Max Operating Temperature=125°C, Max Voltage Rating (AC)=550V, Min Operating Temperature=-55°C, Package Quantity=1, Connector Type=Header, Contact Finish - Mating=GOLD, Contact Material=Bronze, Contact Mating Length=0.32inch, Contact Plating=Gold, Contact Shape=Square, Contact Type="Male Pin", Depth=2.54mm, Fastening Type=Pull, Gender=Male, Height=10.67mm, Housing Color=Black, Housing Material=Polyester, Insulation Color=Black, Insulation Material=PBT, Lead Free="Lead Free", Length=7.62mm, Mount="Through Hole", Number of Contacts=3, Number of Positions=3, Number of Rows=1, Orientation=Straight, Packaging=Bulk, Pitch=2.54mm, Radiation Hardening=No, REACH SVHC="No SVHC", RoHS Compliant=Yes, Series=TSW, Termination=Solder, Width=2.54mm
P1: library part CMP-1024-00383-1, "0.025\" SQ Post Header, Through-hole, Vertical, -55 to 125 degC, 2.54 mm Pitch, 6-Pin, Male, RoHS", Manufacturer=Samtec, Temperature Range="-55 to 125 degC", ComponentLink1Description="Manufacturer URL", ComponentLink1URL=http://www.samtec.com, ComponentLink2Description=Datasheet, ComponentLink2URL=http://www.samtec.com/documents/webfiles/pdf/TSW_TH.PDF, ComponentLink3Description="Package Specification", ComponentLink3URL=http://www.samtec.com/documents/webfiles/cpdf/TSW-XXX-XX-XXX-X-XX-XXX-MKT.pdf, DatasheetVersion=F-214, Mounting Technology=Through-hole, Orientation=Vertical, PackageDescription=".025[0.64] SQ. Post Terminal Strip Assembly", PackageReference=TSW-106-07-X-S, PackageVersion="DM, 8/1988", PartNumber=TSW-106-07-G-S, Pitch="2.54 mm", RoHS=True
R1 R3: library part CMP-2002-01132-2, "Precision Thick Film Chip Resistor, 2.2 kOhm, 100 mW, 1%, -55 to 155 degC, 2-Pin SMD (0402), RoHS, Tape and Reel", Manufacturer=Panasonic, Package Description="2-Pin Surface Mount Device, Body 1 x 0.5 mm", Package Reference=0402, Rated Power=0.1W, Resistance=2.2kO, Temp Coefficient=±100ppm/°C, Tolerance (%)=±1%, Datasheet URL=https://datasheet.ciiva.com/11821/0900766b80f80784-11821273.pdf, Datasheet Version=03/2011, Manufacturer URL=http://www.panasonic.com/, Mounting Technology=SurfaceMount, Size Code=0402
R4 R6 R8 R10 R12 R13 R14 R15: "33 Ohms 1% 0.1W, 1/10W Chip Resistor 0402 (1005 Metric) Automotive AEC-Q200 Thick Film", Package="1005-2 Panasonic", Availability="In Stock", Check_prices=https://www.snapeda.com/parts/ERJ-2RKF33R0X/Panasonic%20Electronic%20Components/view-part/357347/?ref=eda, MF="Panasonic Electronic", MP=ERJ-2RKF33R0X, Price=None, SnapEDA_Link=https://www.snapeda.com/parts/ERJ-2RKF33R0X/Panasonic%20Electronic%20Components/view-part/357347/?ref=snap
R18: "10 kOhms 1% 0.1W, 1/10W Chip Resistor 0402 (1005 Metric) Automotive AEC-Q200 Thick Film", Package="1005-2 Panasonic", Availability="In Stock", Check_prices=https://www.snapeda.com/parts/ERJ-2RKF1002X/Panasonic%20Electronic%20Components/view-part/78636/?ref=eda, MF=Panasonic, MP=ERJ-2RKF1002X, Price=None, SnapEDA_Link=https://www.snapeda.com/parts/ERJ-2RKF1002X/Panasonic%20Electronic%20Components/view-part/78636/?ref=snap
U1 U3: "FLASH - NOR Memory IC 128Mb (16M x 8) SPI - Quad I/O, QPI, DTR 133 MHz 8-SOIC", Package="SOIC-8 Winbond Electronics", Check_prices=https://www.snapeda.com/parts/W25Q128JVSIQ/Winbond/view-part/?ref=eda, MF="Winbond Electronics", MP=W25Q128JVSIQ, SnapEDA_Link=https://www.snapeda.com/parts/W25Q128JVSIQ/Winbond/view-part/?ref=snap
U4: "1-A, low-dropout voltage regulator", Package="SOT-223-4 Texas Instruments", Check_prices=https://www.snapeda.com/parts/TLV1117LV33DCYR/Texas+Instruments/view-part/?ref=eda, MF="Texas Instruments", MP=TLV1117LV33DCYR, SnapEDA_Link=https://www.snapeda.com/parts/TLV1117LV33DCYR/Texas+Instruments/view-part/?ref=snap

## Free pads (board coordinates)
  round 6 hole 3.2: 1(56,107.5) 2(146.3,107.5) 3(146.3,48.1) 4(56,48.1)

## Via types
v1: diameter 0.45, hole 0.3, Top Layer to Bottom Layer, tented both sides, 147 vias
v2: diameter 1.5, hole 1, Top Layer to Bottom Layer, tented both sides, 5 vias
v3: diameter 0.45, hole 0.3, Top Layer to Bottom Layer, tented bottom, 1 vias

## Nets (pads, with @x,y where several pads share a name; then routed paths per layer and width w, separated by ;. In a path a pad name is that pad's centre, name@x,y a point inside that pad or via, vN(x,y) a via of type N, cw(c..) or ccw(c..) an arc to the next point about the centre after c; other vN are vias at no path point)
3V3: 1.2 C3.2 C6.2 C7.2 C8.2 C9.2 C10.2 C11.2 C12.2 C13.2 C14.2 J1.02 J3.02 J4.04 J6.1 J8.04 J9.04 J10.04 J11.03 P1.1 R1.2 R2.1 R3.2 R5.2 R7.2 R16.2 R17.2 R20.1 R21.1 R22.1 R26.1 R27.1 R28.1 R29.1 U1.8 U2.1 U2.9 U2.24 U2.36 U2.48 U3.8 U4.2 U4.4 | length 49.1
  Top Layer w0.2: v1(59.5,76.7) R29.1 ; v1(68.7,60.9) R28.1 ; R27.1 80.312,77.188 81,76.5 81,73.3 81.6,72.7 v1(81.8,72.7) ; v1(83.5,63.9) 83.51,63.89 84.314,63.89 R5.2 ; C8.2 83.637,80.3 85.5,80.3 86.362,79.438 86.73,79.438 86.965,79.203 87.5,79.203 87.765,78.939 U2.1 ; v1(84.4,75.1) 85.435,75.1 C13.2 85.516,75.149 86.852,75.149 C12.2 86.96,75.041 87.392,75.041 87.494,74.939 U2.9 ; v1(87.7,69.8) 87.748,69.752 87.748,69.47 88.126,69.092 R2.1 ; v1(89.621,82.9) 89.669,82.852 89.669,82.111 C11.2 89.881,81.899 89.881,81.442 90.322,81.001 U2.48@90.322,80.433 ; J1.02 90.285,99.885 90.285,98.065 R1.2 ; v1(92.2,109.3) 92.5,109 R3.2 R3.2@93.522,109 ; U1.8 95.07,66.396 96.875,66.396 96.936,66.335 97.665,66.335 v1(97.7,66.3) ; U2.24 95.841,71.387 96.098,71.13 96.098,70.993 96.103,70.993 96.528,70.568 96.528,70.401 96.713,70.216 97.484,70.216 v1(97.5,70.2) ; U2.36 98.316,78.939 98.506,79.129 98.733,79.129 98.848,79.244 C7.2@98.848,79.341 ; R7.2 97.946,65.176 98.476,65.176 v1(98.5,65.2) ; C7.2 98.963,79.299 99.564,79.9 v1(99.6,79.9) ; 1.2 102.12,77.22 102.258,77.358 102.258,77.37 102.6,77.712 v1(102.6,78.2) ; v1@104.775,81.661 105.283,81.153 R16.2 ; v1(105.7,67.2) 105.768,67.2 105.916,67.052 R17.2 ; U3.8 C10.2 107.848,68.225 108.675,68.225 v1(108.7,68.2) ; v1(120.9,66.7) R26.1@122.588,66.7 ; R20.1 v1(137.6,80.4) ; R21.1 v1(137.8,61) ; v1(144,66.9) R22.1@145.888,66.9
  Top Layer w0.5: U4.2@113.792,99.695 113.792,101.492 114.343,102.043 114.343,102.078 C3.2
  other v1: 85,80.3 104.8,81.7 113,91 114,91 115,91 112.014,91.059 115.951,91.059 111,92 112,92 113,92 114,92 115,92 116,92 113.411,92.71 114.427,92.71 115.316,92.71 111,93 116,93 112.395,93.472 113.411,93.472 114.427,93.472 115.316,93.472 111,94 116,94 112.395,94.361 113.411,94.361 114.427,94.361 115.316,94.361 111,95 112,95 116,95 112.9,95.1 114,95.1 115,95.1 111,96 112,96 113,96 114,96 115,96 116,96 111,97 112,97 113,97 114,97 115,97 116,97 111.506,97.663 112.522,97.663 113.538,97.663 114.554,97.663 115.57,97.663
  other v3: 112.395,92.71
ADC1_IN1_N: J7.02 U2.10 | length 40.7
  Top Layer w0.2: J7.02 67.3,97.35 68.4,96.25 69.236,96.25 70.2,95.286 70.2,82.15 72.6,79.75 81.036,79.75 82.4,78.386 82.4,75.314 83.3,74.414 88.22,74.414 88.226,74.42 88.847,74.42 U2.10
ADC1_IN1_P: J7.03 U2.11 | length 40.5
  Top Layer w0.2: J7.03 67.52,94.92 68.4,95.8 69.05,95.8 69.75,95.1 69.75,81.964 72.414,79.3 80.85,79.3 81.95,78.2 81.95,75.127 83.114,73.964 88.22,73.964 88.226,73.958 88.847,73.958 U2.11
BOOT0: R18.2 U2.44 | length 15
  Top Layer w0.2: R18.2 84.2,83.5 86.552,85.852 91.567,85.852 92.353,85.066 92.353,81.505 92.341,81.493 U2.44
BTN1: R20.2 R23.1 S1.1 | length 2.6
  Top Layer w0.2: R23.1 135.694,79.218 135.694,80.394 R20.2 135.688,81.788 S1.1
BTN2: R21.2 R24.1 S2.1 | length 2.5
  Top Layer w0.2: S2.1 135.636,60.836 135.788,60.988 R21.2 135.744,61.044 135.744,62.044 R24.1
BTN3: R22.2 R25.1 S3.1 | length 2.8
  Top Layer w0.2: S3.1 146.812,68.412 R22.2 146.812,66 146.85,65.962 146.85,65.949 146.988,65.812 R25.1@147,65.812
BTN4: R26.2 R30.1 S4.1 | length 2.5
  Top Layer w0.2: R26.2 123.718,66.706 124.694,66.706 R30.1 124.7,68.058 S4.1
BTN5: R27.2 R31.1 S5.1 | length 2.7
  Top Layer w0.2: R31.1 79.15,77.2 R27.2@79.15,77.05 ; 78.7,77.2 78.7,75.9 S5.1
BTN6: R28.2 R32.1 S6.1 | length 2.5
  Top Layer w0.2: R28.2 70.818,60.894 71.994,60.894 R32.1 S6.1
BTN7: R29.2 R33.1 S7.1 | length 2.7
  Top Layer w0.2: R29.2 61.918,76.694 63.294,76.694 R33.1 S7.1
FDCAN1_RX: J8.02 U2.25 | length 45.6
  Top Layer w0.2: U2.25 97.354,73.439 97.4,73.393 v1(97.4,72.7)
  Bottom Layer w0.2: J8.02 79.46,98 95.2,98 95.7,97.5 95.7,81.654 95.7,79.5 97.4,77.8 v1(97.4,72.7)
FDCAN1_TX: J8.03 U2.21 | length 47.3
  Top Layer w0.2: U2.21 94.341,73.041 v1(94.4,73.1)
  Bottom Layer w0.2: J8.03 74.92,97.98 75.6,97.3 94.3,97.3 94.7,96.9 94.7,81.654 94.7,78.2 94.55,78.05 94.55,74.323 94.4,74.173 v1(94.4,73.1)
GND: C1.2 C2.1 C3.1 C4.1 C5.1 C6.1 C7.1 C8.1 C9.1 C10.1 C11.1 C12.1 C13.1 C14.1 C16.1 C17.1 C18.1 C19.1 C20.1 C21.1 C22.1 J1.01 J2.1 J2.2 J2.3 J2.4 J2.A1-B12 J2.B1-A12 J3.01 J4.01 J5.01 J5.04 J6.3 J7.01 J7.04 J8.01 J9.01 J10.01 J11.01 J11.02 P1.3 P1.5 pad.1 pad.2 pad.3 pad.4 R9.2 R11.2 S1.2 S2.2 S3.2 S4.2 S5.2 S6.2 S7.2 S8.2 U1.4 U2.8 U2.23 U2.35 U2.47 U3.4 U4.1 | length 61.1
  Top Layer w0.2: v1(63.3,69.7) S7.2 ; C22.1 v1(65.1,78.9) ; v1(72,53.9) S6.2 ; C21.1 72.968,63.236 72.968,63.7 73.1,63.832 v1(73.1,63.9) ; C20.1 76,75.568 76.1,75.468 v1(76.1,75.4) ; v1(78.8,69.9) S5.2@78.8,71.3 ; C8.1 84.637,81.137 v1@84.7,81.2 ; v1(84.4,76.1) 84.465,76.035 C13.1 85.519,76.016 86.849,76.016 C12.1 87.011,75.854 87.468,75.854 87.883,75.439 U2.8 ; v1(86.1,62.7) 87.746,62.7 U1.4 ; v1(86.1,78.7) 86.167,78.7 86.838,78.029 C1.2 ; C14.1 v1(86.9,81) ; U2.47@90.822,80.433 90.822,81.222 90.602,81.442 C11.1 90.602,82.654 90.799,82.851 91.231,82.851 v1(91.279,82.899) ; v1(91.521,83.813) 91.521,83.745 91.687,83.58 91.687,82.99 C5.1 ; C4.1 94.777,69.365 95.442,68.7 v1(95.5,68.7) ; U2.23 95.36,71.945 95.36,71.305 95.631,71.034 95.631,70.739 95.709,70.661 95.709,70.356 95.867,70.198 95.867,69.333 v1(95.9,69.3) ; C9.1 v1(96.9,68) ; U2.35 97.318,78.437 98.931,78.437 C7.1 99.635,78.435 v1(99.7,78.5) ; v1(104,78.5) 104.007,78.494 104.007,77.017 U3.4 ; C10.1 108.546,67.386 108.632,67.3 v1(108.7,67.3) ; C2.1 111.544,102.762 112.362,102.762 v1(112.4,102.8) ; v1(124.3,99.5) 124.9,100.1 R11.2 ; S4.2 124.6,74.3 v1(124.8,74.5) ; C19.1 v1(126.8,64.3) ; R9.2 128.212,100.788 128.349,100.65 128.349,100.251 v1(129,99.6) ; v1(135.6,87.6) 135.636,87.564 S1.2@135.636,86.147 ; S2.2 135.688,55.279 v1(135.688,53.94) ; C17.1 v1(137.7,64.3) ; C16.1 v1(137.6,76.9) ; S8.2 136.8,106.6 v1(137.1,106.9) ; S3.2@147.066,72.558 147.066,73.866 v1(147.7,74.5) ; C18.1 v1(149,63.6)
  Top Layer w0.5: C3.1 115.243,102.073 116.092,101.224 U4.1 119.38,99.42 v2(119.39,99.41) v2@119.4,99.4 ; v2(121.1,103.6) 122.3,103.6 123.739,105.039 123.739,105.894 J2.B1-A12 ; J2.A1-B12 130.179,104.821 131.7,103.3 v2(132.3,103.3)
  other v1: 84.7,81.3
I2C1_SCL: J1.03 R3.1 U2.42 | length 35.2
  Top Layer w0.2: J1.03@87.63,99.695 89.789,101.854 93.345,101.854 ; U2.42 93.341,89.159 94.1,89.918 94.1,101.737 93.983,101.854 93.345,101.854 ; R3.1 93.337,107.937 93.337,102.743 93.345,102.735 93.345,101.854
I2C1_SDA: J1.04 R1.1 U2.43 | length 24.2
  Top Layer w0.2: J1.04 88.04,97.05 R1.1 91.671,95.779 91.671,92.829 92.841,91.659 U2.43
I3C2_SCL: J3.03 U2.41 | length 28.7
  Top Layer w0.2: U2.41 93.86,80.433 93.86,81.054 93.887,81.08 93.887,85.385 95.3,86.798 95.3,101.5 96.2,102.4 98.9,102.4 100.315,100.985 100.315,100.015 J3.03
I3C2_SDA: J3.04 U2.40 | length 21
  Top Layer w0.2: U2.40 94.341,85.197 96.2,87.056 96.2,96.03 96.2,96.032 96.2,98.41 J3.04
LPUART1_RX: J4.03 U2.31 | length 49.8
  Top Layer w0.2: v1(96.2,76.5) 96.261,76.439 U2.31
  Bottom Layer w0.2: J4.03 74.92,75.68 81.4,69.2 92.942,69.2 96.2,72.458 v1(96.2,76.5)
LPUART1_TX: J4.02 U2.30 | length 47.3
  Top Layer w0.2: v1(95.7,75.9) 95.72,75.92 97.297,75.92 U2.30
  Bottom Layer w0.2: J4.02 75.6,93.1 75.6,77.1 82.2,70.5 93.6,70.5 93.846,70.746 95.7,72.6 v1(95.7,75.9)
NetJ2_A5: J2.A5 R9.1 | length 4.2
  Top Layer w0.2: R9.1 128.263,101.875 128.263,104.28 128.263,105.9 J2.A5
NetJ2_B5: J2.B5 R11.1 | length 4.3
  Top Layer w0.2: R11.1 124.912,101.812 125.229,102.129 J2.B5
NetJ6_2: J6.2 R18.1 | length 3.2
  Top Layer w0.2: J6.2 79.154,83.533 82.255,83.533 R18.1
NetR4_1: R4.1 U1.2 | length 2.5
  Top Layer w0.2: R4.1 85.346,65.149 87.833,65.149 U1.2
NetR5_1: R5.1 U1.3 | length 2.5
  Top Layer w0.2: R5.1 U1.3
NetR6_2: R6.2 U2.29 | length 1.9
  Top Layer w0.2: U2.29@97.316,75.45 99.171,75.45 R6.2
NetR7_1: R7.1 U1.7 | length 1.9
  Top Layer w0.2: U1.7 R7.1
NetR8_2: R8.2 U2.28 | length 3
  Top Layer w0.2: U2.28@97.316,74.95 97.335,74.931 97.951,74.931 98.729,74.153 98.729,74.126 99.564,73.291 R8.2
NetR10_2: R10.2 U2.26 | length 3.7
  Top Layer w0.2: U2.26@97.316,73.95 97.893,73.95 97.993,73.85 98.032,73.85 98.425,73.457 98.425,72.906 99.691,71.64 R10.2
NetR12_2: R12.2 U2.14 | length 3.2
  Top Layer w0.2: R12.2 89.408,70.485 89.662,70.739 90.424,70.739 90.431,70.746 90.841,71.156 U2.14@90.841,71.975
NetR13_2: R13.2 U2.15 | length 2.2
  Top Layer w0.2: U2.15@91.341,71.975 91.341,70.746 91.341,69.953 R13.2
NetR14_2: R14.2 U2.17 | length 2.4
  Top Layer w0.2: U2.17@92.341,71.975 92.36,71.956 92.36,71.089 92.703,70.746 93.079,70.371 R14.2@93.079,69.854
NetR15_1: R15.1 U3.2 | length 2.5
  Top Layer w0.2: U3.2 R15.1@106.553,79.498
NetR16_1: R16.1 U3.3 | length 2.5
  Top Layer w0.2: U3.3 R16.1
NetR17_1: R17.1 U3.7 | length 1.7
  Top Layer w0.2: R17.1 U3.7
NRST: C1.1 P1.6 S8.1 U2.7 | length 95.2
  Top Layer w0.2: v1(83.4,68.6) v1(83.4,71.1) ; v1(84.1,77.1) 84.165,77.165 C1.1 ; C1.1@86.898,77.165 88.105,75.958 88.847,75.958 U2.7 ; v1(129.6,87) 132.9,87 136.686,90.786 ; 136.7,90.8 136.7,101.2 S8.1 ; 136.72,98.5 142.98,98.5 P1.6
  Bottom Layer w0.2: v1(83.4,68.6) 89.874,68.6 90.353,68.121 95.74,68.121 96.198,68.579 100.879,68.579 112.9,80.6 123.2,80.6 v1(129.6,87) ; v1(83.4,71.1) 83.4,75.919 84.056,76.575 84.056,77.056 v1(84.1,77.1)
PB0: C16.2 R23.2 U2.18 | length 164.7
  Top Layer w0.2: v1(73.7,91.3) 74.7,90.3 v1(91,90.3) ; v1(92.6,73.3) 92.6,73.232 92.841,72.991 U2.18 ; v1(135.4,75.4) 135.4,75.406 135.768,75.774 C16.2 135.734,76.934 135.734,78.154 R23.2
  Bottom Layer w0.2: v1(73.7,91.3) 70.6,91.3 58.8,79.5 58.8,65.9 66.4,58.3 125.4,58.3 135.4,68.3 v1(135.4,75.4) ; v1(91,90.3) 92.024,89.276 92.124,89.276 93.1,88.3 93.1,79.028 92.5,78.428 92.5,75.948 92.6,75.848 v1(92.6,73.3)
PB1: C17.2 R24.2 U2.19 | length 162.2
  Top Layer w0.2: v1(73.7,92.1) 90.2,92.1 v1(91.1,91.2) ; v1(93.2,73.8) 93.2,73.732 93.341,73.591 U2.19 ; v1(134.3,64.3) 135.7,64.3 135.734,64.266 135.734,63.146 R24.2
  Bottom Layer w0.2: v1(73.7,92.1) 70,92.1 58,80.1 57.917,80.1 57.917,64.383 65,57.3 131.5,57.3 132.8,58.6 132.8,62.8 v1(134.3,64.3) ; v1(91.1,91.2) 92.224,90.076 92.524,90.076 93.6,89 93.6,81.654 93.6,74.472 93.248,74.12 93.248,73.848 v1(93.2,73.8)
PB2: C18.2 R25.2 U2.20 | length 177.5
  Top Layer w0.2: v1@73.7,92.804 73.704,92.8 90.619,92.8 v1(91.399,92.02) ; v1(93.8,74) 93.822,73.978 93.822,71.983 U2.20 ; v1(146.9,61) 146.934,61.034 146.934,63.566 146.984,63.616 146.984,64.772 R25.2@147,64.788
  Bottom Layer w0.2: v1(73.7,92.8) 69.3,92.8 56.6,80.1 56.6,63.9 64.6,55.9 134.4,55.9 135.8,57.3 143.2,57.3 v1(146.9,61) ; v1(91.399,92.02) 94.1,89.319 94.1,81.654 94.1,74.368 93.8,74.068 v1(93.8,74)
PB8: C19.2 R30.2 U2.45 | length 132.7
  Top Layer w0.2: v1(73.7,90.4) 74.4,89.7 90.357,89.7 90.39,89.668 90.732,89.668 v1(90.78,89.62) ; U2.45 91.841,79.183 92.2,78.824 v1(92.2,78.8) ; v1(124.6,63.5) 124.634,63.534 124.634,64.266 124.684,64.316 124.684,65.672 R30.2
  Bottom Layer w0.2: v1(73.7,90.4) 71.5,90.4 60.2,79.1 60.2,67.3 67.4,60.1 122.5,60.1 124.6,62.2 v1(124.6,63.5) ; v1(90.78,89.62) 91.511,88.889 91.53,88.889 92.592,87.827 92.592,82.609 92.2,82.217 v1(92.2,78.8)
PC13: C20.2 R31.2 U2.2 | length 39.2
  Top Layer w0.2: v1(73.3,83.8) 77.2,87.7 89.7,87.7 v1(90.7,86.7) ; v1(73.4,77.8) 74.068,77.132 C20.2 76.034,77.166 77.154,77.166 R31.2 ; U2.2 89.939,78.439 v1(90.2,78.7)
  Bottom Layer w0.2: v1(73.3,83.8) 73.3,78.042 73.352,77.99 73.352,77.848 v1(73.4,77.8) ; v1(90.2,78.7) 90.2,81.654 90.2,85.124 90.7,85.624 v1(90.7,86.7)
PC14: C21.2 R32.2 U2.3 | length 55.3
  Top Layer w0.2: R32.2 71.984,61.928 71.984,63.084 C21.2 71.984,63.116 71.984,64.084 v1(72,64.1) ; v1(72.6,84.5) 74.548,86.448 74.548,86.548 76.448,88.448 89.952,88.448 v1(91.2,87.2) ; U2.3 90.271,77.939 90.532,78.2 v1(90.6,78.2)
  Bottom Layer w0.2: v1(72,64.1) 71.4,64.7 71.4,83.3 v1(72.6,84.5) ; v1(90.6,78.2) 90.648,78.248 90.648,78.476 90.675,78.503 90.675,81.175 90.7,81.2 90.7,81.654 90.7,83.139 90.942,83.381 90.942,85.224 91.279,85.561 91.279,86.94 91.248,86.971 91.248,87.152 v1(91.2,87.2)
PC15: C22.2 R33.2 U2.4 | length 48.1
  Top Layer w0.2: R33.2 63.3,78.868 C22.2 63.268,80.168 v1(63.3,80.2) ; v1(71.8,85.2) 75.502,88.902 89.492,88.902 89.664,89.073 90.527,89.073 v1(91.6,88) ; U2.4 90.719,77.439 91.08,77.8 v1(91.1,77.8)
  Bottom Layer w0.2: v1(63.3,80.2) 68.3,85.2 v1(71.8,85.2) ; v1(91.1,77.8) 91.1,80.875 91.746,81.521 91.746,82.405 92.1,82.759 92.1,87.5 v1(91.6,88)
PH0: J5.03 U2.5 | length 60.4
  Top Layer w0.2: J5.03 62.205,94.815 63.085,94.815 64.3,93.6 64.3,88.5 67.2,85.6 67.2,77.6 77.3,67.5 79.583,67.5 82,69.917 82,70.9 83.2,72.1 84,72.1 84.3,71.8 84.3,71.417 84.417,71.3 v1(85.7,71.3) ; U2.5 88.885,76.92 91.258,76.92 91.477,76.7 v1(91.5,76.7)
  Bottom Layer w0.2: v1(85.7,71.3) 91.983,71.3 92.1,71.417 92.1,76.1 v1(91.5,76.7)
PH1: J5.02 U2.6 | length 58.5
  Top Layer w0.2: J5.02 64.8,94.76 64.8,88.9 67.7,86 67.7,78.2 77.8,68.1 79.2,68.1 81.6,70.5 81.6,71.2 82.9,72.5 84.683,72.5 84.8,72.383 v1(84.8,72) ; U2.6 88.885,76.42 90.48,76.42 v1(90.5,76.4)
  Bottom Layer w0.2: v1(84.8,72) 91.2,72 91.5,72.3 91.5,75.4 v1(90.5,76.4)
SPI1_MISO: R4.2 U2.16 | length 12.8
  Top Layer w0.171: R4.2 85.356,66.171 85.509,66.323 85.509,66.336 86.434,67.261 86.434,69.543 87.637,70.746 90.805,73.914 91.44,73.914 91.841,73.513 U2.16@91.841,71.975
SPI1_MOSI: R14.1 U1.5 | length 7.3
  Top Layer w0.171: R14.1 93.091,64.05 94.53,62.611 U1.5
SPI1_NCS: R2.2 R12.1 U1.1 | length 4.9
  Top Layer w0.171: R2.2 88.138,66.466 88.093,66.421 88.35,66.421 89.408,67.479 R12.1@89.408,68.937
SPI1_SCK: R13.1 U1.6 | length 18.7
  Top Layer w0.171: R13.1 91.44,61.976 92.583,60.833 97.282,60.833 97.79,61.341 97.79,62.992 96.901,63.881 U1.6
SPI2_CLK: R10.1 U3.6 | length 10.4
  Top Layer w0.171: R10.1 100.715,68.449 101.854,67.31 104.775,67.31 105.283,67.818 U3.6
SPI2_MISO: R15.2 U2.27 | length 37
  Top Layer w0.171: U2.27@97.316,74.45 96.731,74.45 96.616,74.335 96.606,74.335 96.266,73.995 96.266,72.771 98.291,70.746 98.806,70.231 98.806,68.072 100.678,66.2 109.126,66.2 110.109,67.183 110.109,79.502 109.22,80.391 106.684,80.391 R15.2@106.553,80.522
SPI2_MOSI: R8.1 U3.5 | length 6.3
  Top Layer w0.171: R8.1 102.997,73.279 104.013,72.263 U3.5
SPI2_NCS: 1.1 R6.1 U3.1 | length 9.4
  Top Layer w0.171: R6.1 102.235,75.438 ; 1.1 102.108,75.565 102.235,75.438 ; U3.1 107.823,76.496 107.121,75.794 107.121,75.752 106.807,75.438 102.235,75.438
SWDIO: P1.2 U2.34 | length 57
  Top Layer w0.2: U2.34 96.739,77.939 96.639,78.039 96.6,78.039 96.366,78.273 96.366,79.683 96.483,79.8 97.3,79.8 v1(98.7,81.2)
  Bottom Layer w0.2: v1(98.7,81.2) 105.6,88.1 129.4,88.1 134.1,92.8 140.56,92.8 P1.2
SWLCK: P1.4 U2.37 | length 54.2
  Top Layer w0.2: U2.37 95.841,80.818 95.887,80.864 97.064,80.864 v1(98.1,81.9)
  Bottom Layer w0.2: v1(98.1,81.9) 105,88.8 128.6,88.8 134.24,94.44 P1.4
UART2_RX: J9.02 U2.13 | length 24.5
  Top Layer w0.2: U2.13 90.341,72.541 90.441,72.641 90.441,72.679 90.767,73.005 v1(90.767,73.033)
  Bottom Layer w0.2: J9.02 88.9,93.69 88.9,74.9 v1(90.767,73.033)
UART2_TX: J9.03 U2.12 | length 24
  Top Layer w0.2: v1(88,72.6) 88.389,72.989 88.389,73.393 88.435,73.439 U2.12
  Bottom Layer w0.2: J9.03 87.63,72.972 88,72.602 v1(88,72.6)
UART3_RX: J10.02 U2.38 | length 17.7
  Top Layer w0.2: U2.38 95.341,82.859 102.87,90.388 J10.02
UART3_TX: J10.03 U2.39 | length 16.8
  Top Layer w0.2: U2.39 94.841,83.341 100.33,88.83 J10.03
USB_D_N: J2.A7 J2.B7 U2.32 | length 57.4
  Top Layer w0.159: U2.32@97.316,76.95 97.904,76.95 98,77.046 98.942,77.046 98.953,77.034 100.077,77.034 101.346,78.303 101.346,80.971 105.029,84.654 123.831,84.654 126.633,87.456 126.633,105.345 126.658,105.37 126.658,105.864 J2.A7 126.729,104.728 127.012,104.446 127.388,104.446 127.729,104.786 J2.B7
USB_D_P: J2.A6 J2.B6 U2.33 | length 56.9
  Top Layer w0.159: U2.33@97.316,77.45 97.904,77.45 98,77.355 99.069,77.355 99.081,77.343 99.949,77.343 101.037,78.431 101.037,81.099 104.901,84.963 123.704,84.963 126.324,87.584 126.324,105.345 126.299,105.37 126.299,105.864 J2.B6 126.158,105.864 126.158,105.258 v1(125.8,104.9) ; v1(127.2,104.9) 127.214,104.914 127.214,105.92 J2.A6
  Bottom Layer w0.159: v1(125.8,104.9) v1(127.2,104.9)
VCAP: C4.2 C5.2 U2.22 U2.46 | length 13.7
  Top Layer w0.2: C5.2 91.694,81.382 91.441,81.129 91.441,81.091 91.341,80.991 U2.46 91.341,78.559 95,74.9 95,73.028 94.86,72.888 94.86,71.983 U2.22 94.86,71.945 94.86,71.002 94.869,70.993 94.742,70.866 C4.2
VIN: C2.2 J2.A4-B9 J2.B4-A9 J11.04 U4.3 | length 111.8
  Top Layer w0.5: v2(107.5,104.2) 107.56,104.14 110.109,104.14 ; U4.3@111.325,99.199 111.499,99.373 111.499,101.793 110.297,101.793 109.728,102.362 109.728,103.759 110.109,104.14 ; J2.B4-A9 124.579,104.079 122.4,101.9 120.5,101.9 118.26,104.14 110.109,104.14 ; J2.A4-B9 129.379,103.721 v2@132.2,100.9
  Bottom Layer w0.5: J11.04 61.2,104.2 117.4,104.2 120.7,100.9 v2(132.1,100.9)
pads on no net: J2.A8 J2.B8

## Polygon pours and split planes (outlines as drawn)
3V3 on Top Layer "Top Layer-3V3" (solid, pour order 12): 115.951,90.17 ccw(c115.951,91.44) 117.221,91.44 117.221,97.028 ccw(c116.078,97.028) 116.078,98.171 115.363,98.171 115.363,99.648 ccw(c114.582,99.648) 114.582,100.429 114.332,100.429 113.792,100.838 113.252,100.429 113.002,100.429 ccw(c113.002,99.648) 112.221,99.648 112.221,98.171 111.506,98.171 ccw(c111.506,97.028) 110.363,97.028 110.363,91.694 ccw(c111.887,91.694) 111.887,90.17
GND on GND "GND-GND" (solid, remove dead copper, pour order 15): 52.2,47.04 ccw(c54.74,47.04) 54.74,44.5 147.26,44.5 ccw(c147.26,47.04) 149.8,47.04 149.8,108.76 ccw(c147.26,108.76) 147.26,111.3 54.74,111.3 ccw(c54.74,108.76) 52.2,108.76
3V3 on PWR "3V3_L03_P016" (solid, remove dead copper, pour order 16): 52.2,108.76 cw(c54.74,108.76) 54.74,111.3 147.26,111.3 cw(c147.26,108.76) 149.8,108.76 149.8,47.04 cw(c147.26,47.04) 147.26,44.5 54.74,44.5 cw(c54.74,47.04) 52.2,47.04 52.2,101.3

## Silkscreen, mask and mechanical layers (free items; w line width, h text height)
Top Overlay:
  text "FDCAN" at 72.65,107.95 h1.5
  text "I2C" at 86.75,107.75 h1.5
  text "I3C" at 99.85,107.65 h1.5
  text "VIN" at 54.95,102.15 h1.5
  text "SCL" at 88.25,102.05 h1.5 r90
  text "SCL" at 100.85,102.05 h1.5 r90
  text "3V3" at 72.75,101.95 h1.5 r90
  text "TX" at 75.65,101.95 h1.5 r90
  text "RX" at 78.25,101.95 h1.5 r90
  text "GND" at 80.75,101.95 h1.5 r90
  text "SDA" at 85.75,101.95 h1.5 r90
  text "GND" at 93.45,101.95 h1.5 r90
  text "SDA" at 98.25,101.95 h1.5 r90
  text "3V3" at 90.95,101.85 h1.5 r90
  text "3V3" at 103.65,101.85 h1.5 r90
  text "GND" at 106.25,101.85 h1.5 r90
  text "NRST" at 136.75,98.75 h1.5
  text "GND" at 138.15,96.15 h1.5
  text "3V3" at 55.05,96.05 h1.5 r90
  text "SWLCK" at 135.15,93.55 h1.5
  text "GND" at 137.95,91.05 h1.5
  text "TX" at 78.25,90.75 h1.5 r90
  text "RX" at 75.65,90.65 h1.5 r90
  text "RX" at 90.75,90.65 h1.5 r90
  text "RX" at 103.65,90.65 h1.5 r90
  text "TX" at 88.45,90.55 h1.5 r90
  text "TX" at 101.05,90.45 h1.5 r90
  text "DEBUG" at 147.95,90.25 h1.5 r90
  text "GND" at 80.95,89.35 h1.5 r90
  text "3V3" at 73.05,89.25 h1.5 r90
  text "GND" at 93.45,89.15 h1.5 r90
  text "3V3" at 85.85,88.95 h1.5 r90
  text "3V3" at 98.45,88.95 h1.5 r90
  text "GND" at 106.35,88.95 h1.5 r90
  text "SWDIO" at 135.35,88.75 h1.5
  text "LPUART" at 68.55,86.75 h1.5
  text "UART" at 85.15,86.55 h1.5
  text "UART" at 98.55,86.45 h1.5
  text "3V3" at 137.75,85.85 h1.5
  text "STM32H503 DEV BOARD REV A" at 76,56.2 h2
  text "DESIGNED BY ROHAN BHARGAVA" at 76.25,53.05 h2
Mechanical 1:
  the board outline again, w0.254